# Altium PCB Copy of PCB.PcbDoc (part 3 of 5)
Units mm, origin at the board's own origin, x right, y up, seen from the top; angles counter-clockwise.
Board outline 130 x 115.04 mm, 6 copper layers (Top Layer, Int1 (GND), Int2, Int3 (PWR), Int4 (GND), Bottom Layer), stack 1.647 mm thick; 306 components, 246 nets, 1107 pads, 360 vias.
Unrouted connection lines stored in the file: 123.
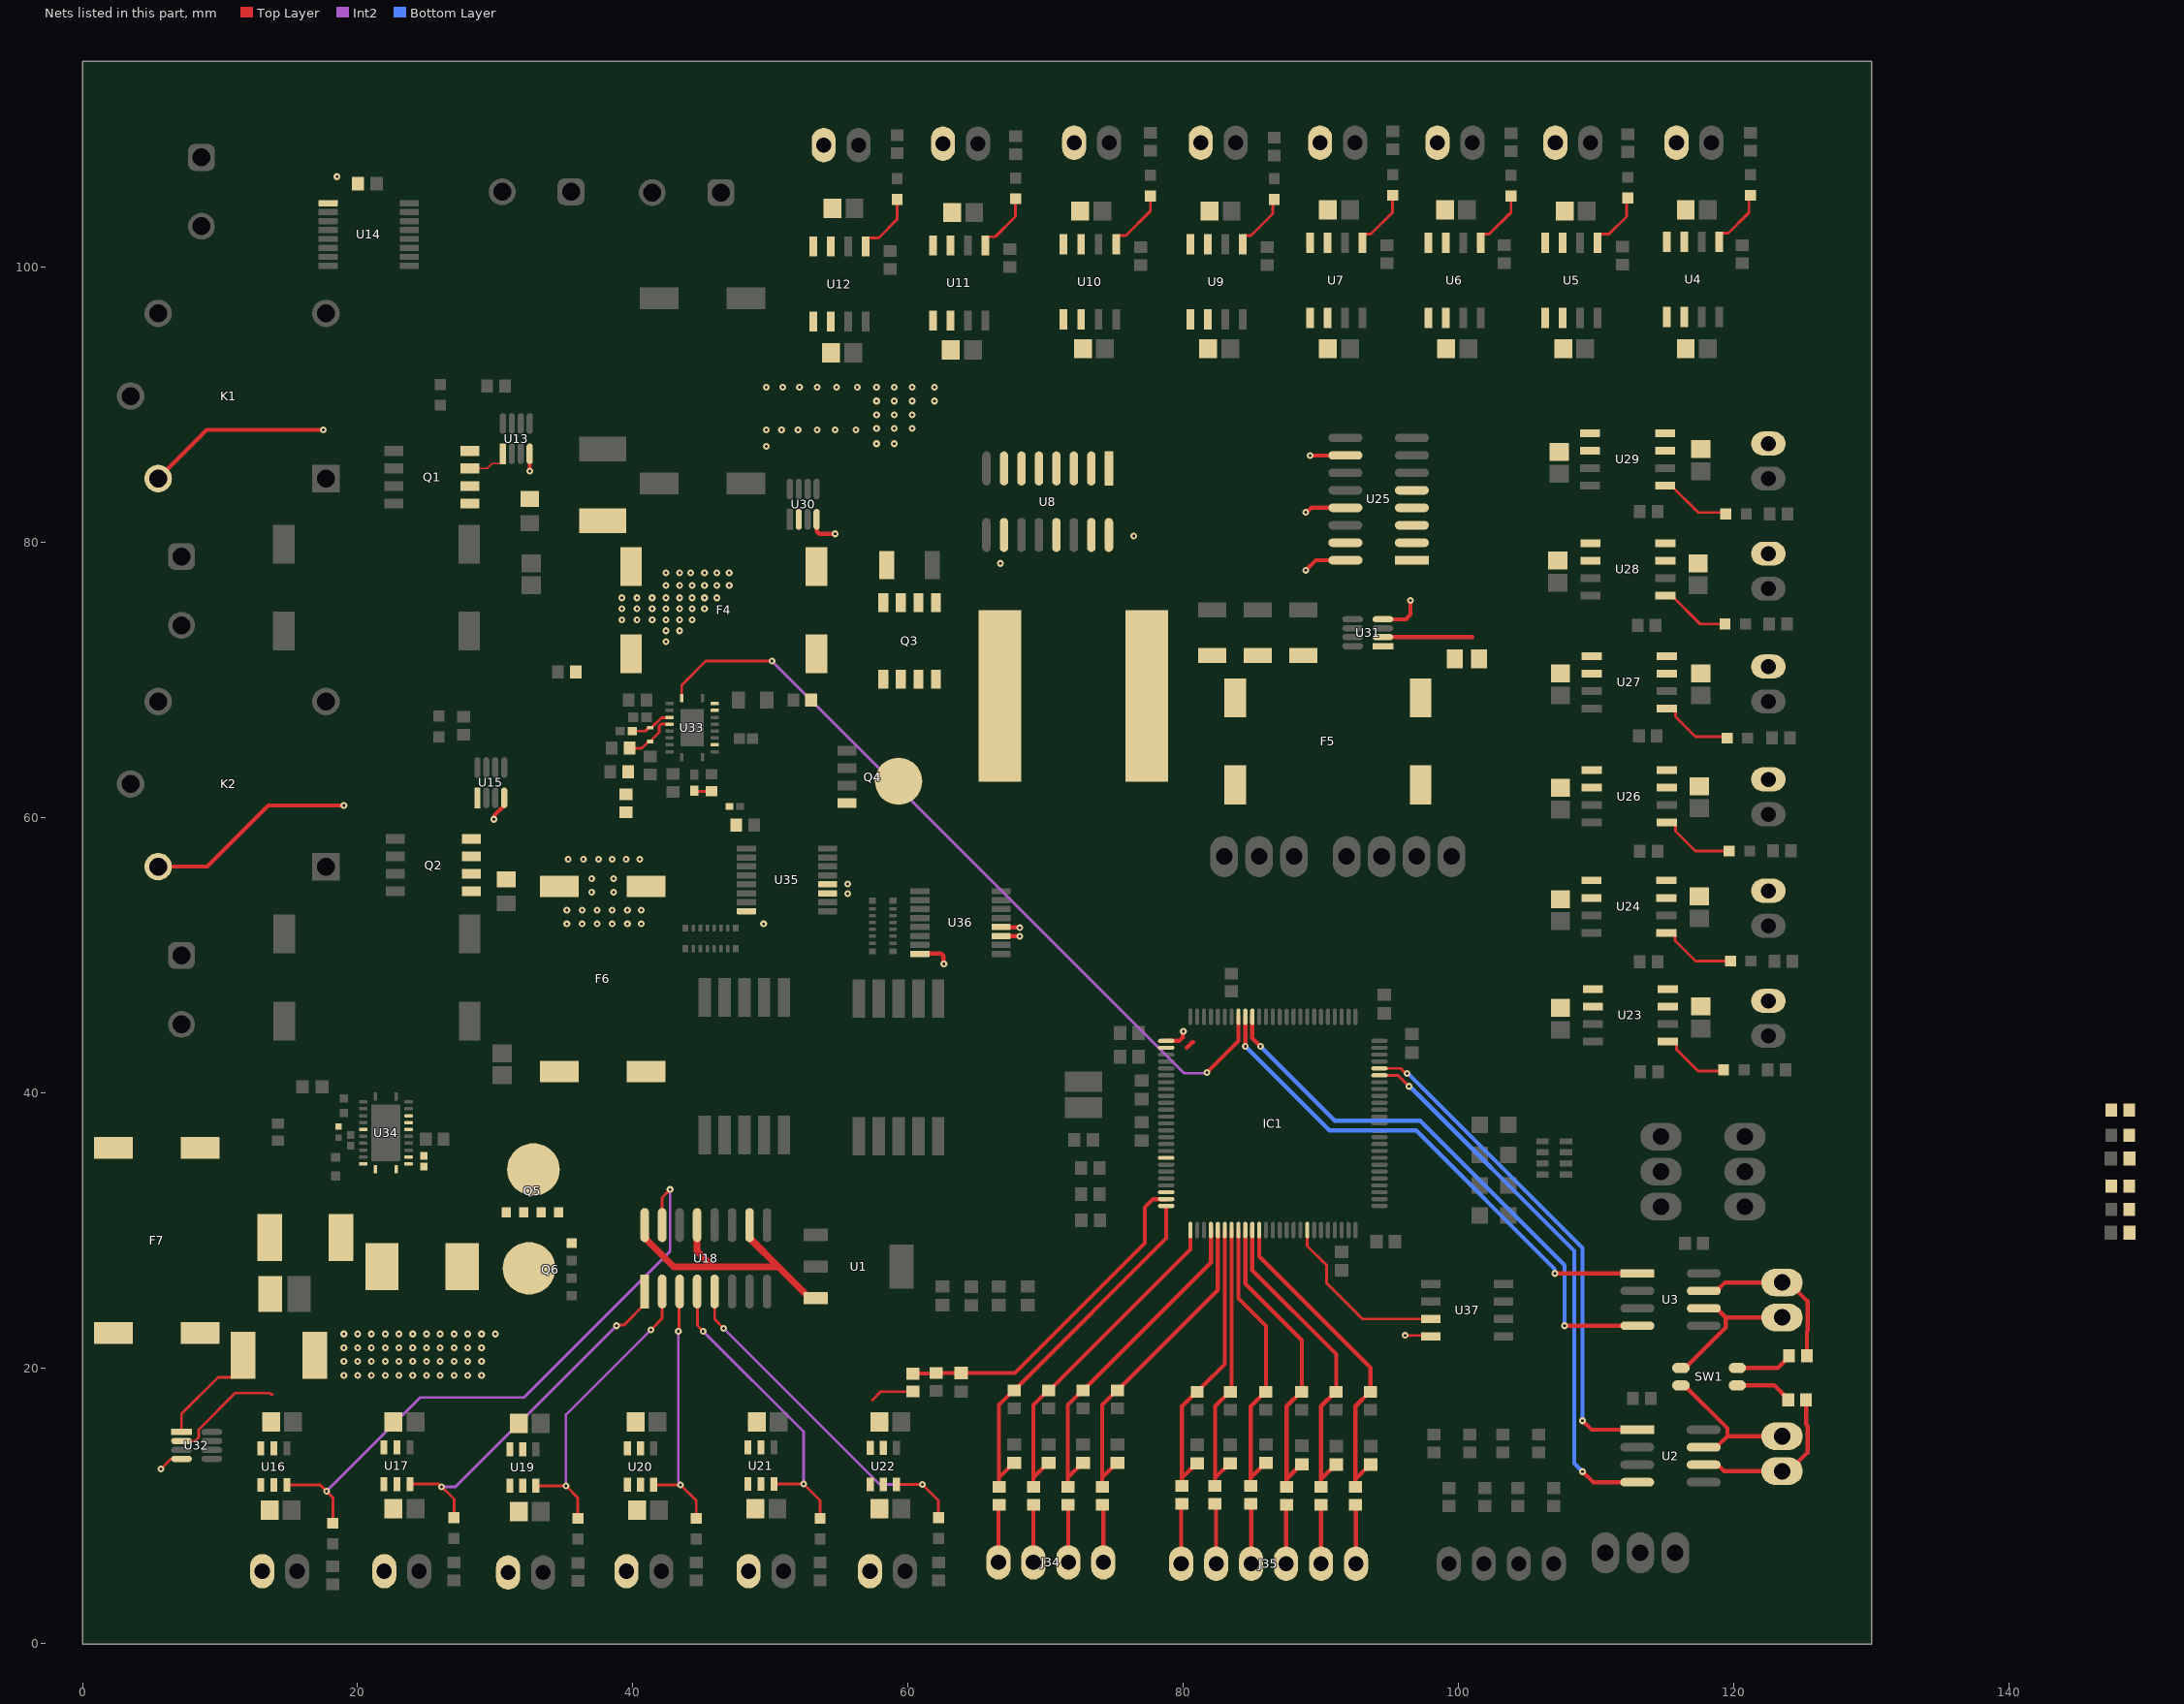
[diagram p6: the nets of this part, all layers, seen from the top]

## Part data (continued)
D2: library part SM0805UYC, "LED YELLOW CLEAR 0805 SMD", Current - Test=20mA, Device Package="0805 (2012 Metric)", Lens Color=Colorless, manufacturer="Bivar Inc.", Millicandela Rating=70mcd, Supplier Device Package=0805, Supplier Part Number 1=492-1328-1-ND, Voltage - Forward (Vf) (Typ)=2.1V, Color=Yellow, componentlink1description=Datasheet, componentlink1url=https://www.bivar.com/Files/Datasheets/SM0805UYC.pdf, componentlink2description="DigiKey Link", componentlink2url=https://www.digikey.com/en/products/detail/bivar-inc/SM0805UYC/2408547, Configuration=Standard, Height (Max)=0.80mm, lastupdated="1/17/2024 9:34:39 PM", Lens Size="1.40mm x 1.20mm", Lens Style="Rectangle with Flat Top", Lens Transparency=Clear, Lifecycle Status=Active, Minimum Order=1, Mounting Type="Surface Mount", Package / Case="0805 (2012 Metric)", packaging=TapeAndReel, Part Number=SM0805UYC, Part Status=Active, partid=64, price=0.17, series=-, Size / Dimension="2.00mm L x 1.20mm W", Supplier 1=DigiKey, Viewing Angle=130°, Wavelength - Dominant=592nm, Wavelength - Peak=593nm
D3: library part SM0805UGC, "LED GREEN CLEAR 0805 SMD", Current - Test=20mA, Device Package="0805 (2012 Metric)", Lens Color=Colorless, manufacturer="Bivar Inc.", Millicandela Rating=10mcd, Supplier Device Package=0805, Supplier Part Number 1=492-1329-1-ND, Voltage - Forward (Vf) (Typ)=2V, Color=Green, componentlink1description=Datasheet, componentlink1url=https://www.bivar.com/Files/Datasheets/SM0805UGC.pdf, componentlink2description="DigiKey Link", componentlink2url=https://www.digikey.com/en/products/detail/bivar-inc/SM0805UGC/2408549, Configuration=Standard, Height (Max)=1.10mm, lastupdated="1/17/2024 9:33:43 PM", Lens Size="1.40mm x 1.20mm", Lens Style="Rectangle with Flat Top", Lens Transparency=Clear, Lifecycle Status=Active, Minimum Order=1, Mounting Type="Surface Mount", Package / Case="0805 (2012 Metric)", packaging=TapeAndReel, Part Number=SM0805UGC, Part Status=Active, partid=247, price=0.19, series=-, Size / Dimension="2.00mm L x 1.20mm W", Supplier 1=DigiKey, Viewing Angle=130°, Wavelength - Dominant=565nm, Wavelength - Peak=563nm
D4: library part SM0805UBWC, "LED BLUE CLEAR 0805 SMD", Current - Test=20mA, Device Package="0805 (2012 Metric)", Lens Color=Colorless, manufacturer="Bivar Inc.", Millicandela Rating=115mcd, Supplier Device Package=0805, Supplier Part Number 1=492-1330-1-ND, Voltage - Forward (Vf) (Typ)=3.3V, Color=Blue, componentlink1description=Datasheet, componentlink1url=https://www.bivar.com/Files/Datasheets/SM0805UBWC.pdf, componentlink2description="DigiKey Link", componentlink2url=https://www.digikey.com/en/products/detail/bivar-inc/SM0805UBWC/2408548, Configuration=Standard, Height (Max)=1.10mm, lastupdated="1/17/2024 9:31:18 PM", Lens Size="1.40mm x 1.20mm", Lens Style="Rectangle with Flat Top", Lens Transparency=Clear, Lifecycle Status=Active, Minimum Order=1, Mounting Type="Surface Mount", Package / Case="0805 (2012 Metric)", packaging=TapeAndReel, Part Number=SM0805UBWC, Part Status=Active, partid=763, price=0.46, series=-, Size / Dimension="2.00mm L x 1.20mm W", Supplier 1=DigiKey, Viewing Angle=130°, Wavelength - Dominant=470nm, Wavelength - Peak=468nm
D5 D6 D7 D8 D9 D10 D11 D12 D13 D14 D15 D16 D17 D18 D19 D20 D21 D22 D23 D24 D25 D26: library part 19-213SDRC/S259/TR8, "LED RED CLEAR 2SMD", Current - Test=10mA, Device Package="0603 (1608 Metric)", Lens Color=Colorless, manufacturer="Everlight Electronics Co Ltd", Supplier Device Package=2-SMD, Supplier Part Number 1=1080-1580-1-ND, Voltage - Forward (Vf) (Typ)=2V, Color=Red, componentlink1description=Datasheet, componentlink1url=//media.digikey.com/pdf/Data%20Sheets/Everlight%20PDFs/19-213SDRC-S259-TR8.pdf, componentlink2description="DigiKey Link", componentlink2url=http://digikey.com/product-detail/en/everlight-electronics-co-ltd/19-213SDRC-S259-TR8/1080-1580-1-ND/8535303, Configuration=Standard, Height (Max)=0.70mm, lastupdated="2/2/2024 9:29:56 PM", Lens Size="1.20mm x 0.80mm", Lens Style="Rectangle with Flat Top", Lens Transparency=Clear, Lifecycle Status=Active, Minimum Order=1, Mounting Type="Surface Mount", Package / Case="0603 (1608 Metric)", packaging=TapeAndReel, Part Number=19-213SDRC/S259/TR8, Part Status=Active, partid=372, price=0.06, series=-, Size / Dimension="1.60mm L x 0.80mm W", Supplier 1=DigiKey, Viewing Angle=120°, Wavelength - Peak=650nm
DS1 DS2: library part CMP-44525-000002-1, "DISPLAY 7-SEG 0.2\" SGL RED 10SMD", Case/Package=SMD/SMT, Color=Red, Forward Current=30mA, Forward Voltage=1.95V, Max Operating Temperature=85°C, Max Power Dissipation=75mW, Min Operating Temperature=-40°C, Package Quantity=650, Test Current=20mA, Element Configuration="Common Cathode", Height=0.315inch, Illumination Color=Red, Lead Free="Lead Free", Luminous Intensity=30mcd, Number of Characters=1, Operating Supply Voltage=1.95V, packaging="Tape and Reel", Power Consumption=75mW, Wavelength=630nm, Width=0.272inch
F1 F2 F3 F4 F5 F6 F7: library part 3587-10TR, Package=None, Availability=Unavailable, MP=3587-10TR, price=None
IC1: "IC MCU 32BIT 512KB FLASH 100LQFP", Device Package=100-LQFP, manufacturer=STMicroelectronics, Operating Temperature="-40°C ~ 85°C (TA)", Supplier Device Package="100-LQFP (14x14)", Supplier Part Number 1=497-15375-ND, Voltage - Supply (Vcc/Vdd)="1.7V ~ 3.6V", componentlink1description=Datasheet, componentlink1url=http://www.st.com/content/ccc/resource/technical/document/datasheet/65/cb/75/50/53/d6/48/24/DM00141306.pdf/files/DM00141306.pdf/jcr:content/translations/en.DM00141306.pdf, componentlink2description="DigiKey Link", componentlink2url=//digikey.com/product-detail/en/stmicroelectronics/STM32F446VET6/497-15375-ND/5175961, Connectivity="CANbus, EBI/EMI, I²C, IrDA, LINbus, SAI, SD, SPDIF-Rx, SPI, UART/USART, USB, USB OTG", Core Processor="ARM® Cortex®-M4", Core Size=32-Bit, Data Converters="A/D 16x12b; D/A 2x12b", lastupdated="12/6/2019 1:21:46 AM", Lifecycle Status=0, Minimum Order=1, Mounting Type="Surface Mount", Number of I/O=81, Oscillator Type=Internal, Package / Case=100-LQFP, packaging=Tray, Part Number=STM32F446VET6, Part Status=Active, partid=128, Peripherals="Brown-out Detect/Reset, DMA, I²S, LVD, POR, PWM, WDT", price=8.21, Program Memory Size="512KB (512K x 8)", Program Memory Type=FLASH, RAM Size="128K x 8", series=STM32F4, Speed=180MHz, Supplier 1=DigiKey
J1: "CONN HEADER VERT 4POS 2.54MM", Insulation Color=Natural, manufacturer=Molex, Material Flammability Rating="UL94 V-0", Supplier Part Number 1=WM4113-ND, componentlink1description=Datasheet, componentlink1url=https://www.molex.com/pdm_docs/sd/022272041_sd.pdf, componentlink2description="DigiKey Link", componentlink2url=http://digikey.com/product-detail/en/molex/0022272041/WM4113-ND/1130579, Connector Type=Header, Contact Finish - Mating=Tin, Contact Finish - Post=Tin, Contact Finish Thickness - Mating="100.0µin (2.54µm)", Contact Length - Mating="0.295\" (7.49mm)", Contact Length - Post="0.140\" (3.56mm)", Contact Material=Brass, Contact Shape=Square, Contact Type="Male Pin", Fastening Type="Friction Lock", Insulation Height="0.461\" (11.70mm)", Insulation Material="Polyamide (PA), Nylon", lastupdated="1/12/2020 11:52:05 PM", Lifecycle Status=Active, Minimum Order=1, Mounting Type="Through Hole", Number of Positions=4, Number of Positions Loaded=All, Number of Rows=1, Overall Contact Length="0.560\" (14.22mm)", packaging=Bulk, Part Number=0022272041, Part Status=Active, partid=78, Pitch - Mating="0.100\" (2.54mm)", price=0.40, series="KK 6410", Shrouding="Shrouded - 1 Wall", Style="Board to Cable/Wire", Supplier 1=DigiKey, Termination=Solder
J2 J3 J4 J5: "CONN HEADER VERT 3POS 2.54MM", Part Number=0022272031
J6 J7: "CONN HEADER VERT 2POS 2.54MM", Part Number=0022272021
J8 J9 J10 J11 J12 J13 J14 J15 J19 J20 J21 J22 J23 J24 J25 J26 J27 J28 J29 J30: "TERM BLK 2P SIDE ENT 2.54MM PCB", Color=Green, Current=10A, manufacturer="TE Connectivity AMP Connectors", Supplier Part Number 1=A98333-ND, Voltage=150V, componentlink1description=Datasheet, componentlink1url=https://www.te.com/commerce/DocumentDelivery/DDEController?Action=srchrtrv&DocNm=282834&DocType=Customer+Drawing&DocLang=English, componentlink2description="DigiKey Link", componentlink2url=http://digikey.com/product-detail/en/te-connectivity-amp-connectors/282834-2/A98333-ND/1150135, lastupdated="1/15/2020 4:15:38 AM", Lifecycle Status=Active, Mating Orientation="Horizontal with Board", Minimum Order=1, Mounting Type="Through Hole", Number of Levels=1, packaging=Bulk, Part Number=282834-2, Part Status=Active, Pitch="0.100\" (2.54mm)", Positions Per Level=2, price=0.88, series=Buchanan, Supplier 1=DigiKey, Wire Gauge="16-30 AWG", Wire Termination="Screw - Rising Cage Clamp"
J16 J17 J18 J31 J32: library part CMP-1502-03324-2, Current Rating=16A, Max Operating Temperature=120°C, Min Operating Temperature=-30°C, Voltage Rating=300V, Contact Material="Nickel, Tin", Height=11.6mm, Lead Pitch=5mm, NexarPartId=78871135, Number of Contacts=2, Number of Pins=2, Number of Rows=1, packaging=Box, RoHS=Non-Compliant
J33 J34: "TERM BLK 4P SIDE ENT 2.54MM PCB", Color=Green, Current=10A, manufacturer="TE Connectivity AMP Connectors", Supplier Part Number 1=A98335-ND, Voltage=150V, componentlink1description=Datasheet, componentlink1url=https://www.te.com/commerce/DocumentDelivery/DDEController?Action=srchrtrv&DocNm=282834&DocType=Customer+Drawing&DocLang=English, componentlink2description="DigiKey Link", componentlink2url=http://digikey.com/product-detail/en/te-connectivity-amp-connectors/282834-4/A98335-ND/1153265, lastupdated="1/15/2020 4:16:05 AM", Lifecycle Status=Active, Mating Orientation="Horizontal with Board", Minimum Order=1, Mounting Type="Through Hole", Number of Levels=1, packaging=Bulk, Part Number=282834-4, Part Status=Active, Pitch="0.100\" (2.54mm)", Positions Per Level=4, price=2.68, series=Buchanan, Supplier 1=DigiKey, Wire Gauge="16-30 AWG", Wire Termination="Screw - Rising Cage Clamp"
J35: "TERM BLK 6P SIDE ENT 2.54MM PCB", Color=Green, Current=10A, manufacturer="TE Connectivity AMP Connectors", Supplier Part Number 1=A98337-ND, Voltage=150V, componentlink1description=Datasheet, componentlink1url=https://www.te.com/commerce/DocumentDelivery/DDEController?Action=srchrtrv&DocNm=282834&DocType=Customer+Drawing&DocLang=English, componentlink2description="DigiKey Link", componentlink2url=http://digikey.com/product-detail/en/te-connectivity-amp-connectors/282834-6/A98337-ND/1153267, lastupdated="1/15/2020 4:16:31 AM", Lifecycle Status=Active, Mating Orientation="Horizontal with Board", Minimum Order=1, Mounting Type="Through Hole", Number of Levels=1, packaging=Bulk, Part Number=282834-6, Part Status=Active, Pitch="0.100\" (2.54mm)", Positions Per Level=6, price=4.72, series=Buchanan, Supplier 1=DigiKey, Wire Gauge="16-30 AWG", Wire Termination="Screw - Rising Cage Clamp"
K1 K2: library part CMP-03395-000112-1, "RELAY GEN PURPOSE SPDT 10A 5V", Ambient Temperature Range High=+70°C, Ambient Temperature Range Low=-30°C, Coil Power=360mW, Coil Resistance=70Ω, Coil Voltage=5V, Current Rating=10A, manufacturer=TE, Automotive=No, Category=Relay, Coil Type=Non-Latching, componentlink2description=Datasheet, componentlink2url=https://www.te.com/usa-en/product-1-1721150-0.html?te_bu=Cor&te_type=other&te_campaign=oct_glo_cor-oct-global-oth-prtnr-fy19-oct-octo-buy-bom_sma-298_2&elqCampaignId=35216, Device Class L1=Electromechanical, Device Class L2=Relays, Device Class L3="Power Relays", Digikey Description="RELAY GEN PURPOSE SPDT 10A 5V", Height=16.3mm, Lead Free=Yes, Manufacturer Part Number=1-1721150-0, Number of Contacts=1, Octopart=https://octopart.com/1-1721150-0-te+connectivity-41294869, Package=1-1721150-0, RoHS=TRUE, Standoff Height=0.2mm, Switching Current=10A, Throw Configuration=SPDT
L1: "No Description Available", Mfr_Name=Coilcraft, Copyright="Copyright (C) 2024 Ultra Librarian. All rights reserved.", Manufacturer_Part_Number=XAL1580-302MED, RefDes=RefDes, Type=DEV
L2: library part CMP-2000-06445-2, "Commercial Inductors, High Saturation Series 0.47uH 17.5A 4.2mΩ 20%", Case Code (Imperial)=2525, Current Rating=17.5A, DC Resistance (DCR)=4.2mR, Inductance=470nH, Inductance Tolerance=20%, Max DC Current=26A, Max Operating Temperature=125°C, Min Operating Temperature=-55°C, Package Quantity=2000, Self Resonant Frequency=5MHz, Test Frequency=100kHz, Case/Package=2525, Contact Plating=Tin, Core Material=Metal, Depth=6.72mm, Height=3mm, Height - Seated (Max)=0.118inch, Lead Free="Lead Free", Length=7.24mm, Military Standard=Not, Mount="Surface Mount", Number of Pins=2, packaging="Tape and Reel", Radiation Hardening=No, RMS Current (Irms)=17.5A, Saturation Current=26A, Shielding=Shielded, Termination=SMD/SMT, Tolerance=20%, Width=6.47mm
Q1 Q2 Q3: "60-V, N channel NexFETâ„¢ power MOSFET, single SON 5 mm x 6 mm, 2.2 mOhm", Package="VSON-CLIP-8 Texas Instruments", Availability="In Stock", Check_prices=https://www.snapeda.com/parts/CSD18540Q5B/Texas+Instruments/view-part/?ref=eda, MF="Texas Instruments", MP=CSD18540Q5B, price=None, Purchase-URL=https://pricing.snapeda.com/search/part/CSD18540Q5B/?ref=eda, SnapEDA_Link=https://www.snapeda.com/parts/CSD18540Q5B/Texas+Instruments/view-part/?ref=snap
Q4: library part CMP-04962-000031-1, "MOSFET N-CH 40V 100A 8VSON", Continuous Drain Current (ID)=100A, Drain To Source Breakdown Voltage=40V, Drain To Source Resistance=1.3mR, Gate to Source Voltage (Vgs)=20V, Input Capacitance=13.9nF, Max Operating Temperature=150°C, Max Power Dissipation=195W, Min Operating Temperature=-55°C, Package Quantity=250, Power Dissipation=3.1W, Threshold Voltage=1.8V, Contact Plating=Gold, Drain to Source Voltage (Vdss)=40V, Element Configuration=Single, Fall Time=11ns, Lead Free="Contains Lead", Mount="Surface Mount", Number Of Channels=1, Number of Elements=1, Number of Pins=8, packaging="Tape and Reel", Rds On Max=1.2mR, REACH SVHC="No SVHC", Rise Time=19ns, RoHS Compliant=Yes, Turn-Off Delay Time=57ns, Turn-On Delay Time=9ns, Weight=0.000847oz
Q5: library part CMP-04962-000014-1, "MOSFET N-CH 60V 8SON", Continuous Drain Current=13A, Drain To Source Breakdown Voltage=60V, Drain To Source Resistance=7.8mΩ, Gate To Source Voltage=20V, Input Capacitace At Vds="1360pF @ 30V", manufacturer="Texas Instruments", Max Forward Diode Voltage=1V, Max Junction Temp=+150°C, Package=DQJ0008A, Power Dissipation=3.1W, Pulse Drain Current=229A, Temperature="-55°C to +150°C", Temperature Range Low=-55°C, Typ Forward Diode Voltage=0.8V, Automotive=No, Category=Trans, componentlink2description=Datasheet, componentlink2url=http://www.ti.com/lit/ds/symlink/csd18534q5a.pdf, Depletion Mode=False, Device Class L1="Discrete Semiconductors", Device Class L2=Transistors, Device Class L3=MOSFETs, Digikey Description="MOSFET N-CH 60V 8SON", Drain To Source Voltage=60V, Gate Charge At Vgs="17nC @ 10V", Height=1.1mm, Lead Free=Yes, Manufacturer Part Number=CSD18534Q5A, Mouser Description="MOSFET 60V N-Ch NexFET Pwr MOSFET", Number Of Channels=1, Number Of N Channels=1, Octopart=https://octopart.com/csd18534q5a-texas+instruments-22791040, Reverse Recovery Charge=54nC, Reverse Recovery Time=40ns, RoHS=TRUE, Rthja Max=50°C/W, Temperature Range High=+150°C, Threshold Vgs Max=2.3V, Threshold Vgs Min=1.5V, Transconductance=72S, Turn Off Delay Time=15ns, Turn On Delay Time=5.2ns
Q6: library part CMP-04962-000077-1, "MOSFET N-CH 40V 89A 8VSON", Continuous Drain Current (ID)=89A, Drain to Source Voltage (Vdss)=40V, Max Operating Temperature=150°C, Max Power Dissipation=74W, Min Operating Temperature=-55°C, Element Configuration=Single, Mount="Surface Mount", Number of Pins=8, packaging="Cut Tape", Rds On Max=7.9mR, RoHS Compliant=Yes
R1 R31: library part AA0603FR-0710KL, "RES SMD 10K OHM 1% 1/10W 0603", Device Package="0603 (1608 Metric)", manufacturer=Yageo, Operating Temperature="-55°C ~ 155°C", Power (Watts)="0.1W, 1/10W", Ratings=AEC-Q200, Supplier Device Package=0603, Supplier Part Number 1=13-AA0603FR-0710KLCT-ND, Temperature Coefficient=±150ppm/°C, Tolerance=±1%, componentlink1description=Datasheet, componentlink1url=https://www.yageo.com/upload/media/product/productsearch/datasheet/rchip/PYu-AA_51_RoHS_L_3.pdf, componentlink2description="DigiKey Link", componentlink2url=https://www.digikey.com/en/products/detail/yageo/AA0603FR-0710KL/5888698, Composition="Thick Film", Features="Anti-Sulfur, Automotive AEC-Q200, Moisture Resistant", Height - Seated (Max)="0.022\" (0.55mm)", lastupdated="1/24/2024 8:37:51 PM", Lifecycle Status=Active, Minimum Order=1, Number of Terminations=2, Package / Case="0603 (1608 Metric)", packaging=TapeAndReel, Part Number=AA0603FR-0710KL, Part Status=Active, partid=64302, price=0.01, Resistance="10 kOhms", series=AA, Size / Dimension="0.063\" L x 0.031\" W (1.60mm x 0.80mm)", Supplier 1=DigiKey
R2 R3: library part AA0603FR-0710KL, "RES SMD 10K OHM 1% 1/10W 0603", Part Number=AA0603FR-0710KL
R4 R5: library part ERA-3AEB121V, "RES SMD 120 OHM 0.1% 1/10W 0603", Part Number=ERA-3AEB121V
R6 R7 R8 R9 R10 R11 R16 R17 R18 R19: library part 7-2176089-3, "RES SMD 64.9K OHM 0.1% 1/6W 0603", Device Package="0603 (1608 Metric)", manufacturer="TE Connectivity Passive Product", Operating Temperature="-55°C ~ 155°C", Power (Watts)="0.167W, 1/6W", Supplier Device Package=0603, Supplier Part Number 1=A110282CT-ND, Temperature Coefficient=±25ppm/°C, Tolerance=±0.1%, componentlink1description=Datasheet, componentlink1url=https://www.te.com/commerce/DocumentDelivery/DDEController?Action=srchrtrv&DocNm=1773272&DocType=DS&DocLang=English, componentlink2description="DigiKey Link", componentlink2url=https://www.digikey.com/en/products/detail/te-connectivity-passive-product/7-2176089-3/4033750, Composition="Thin Film", Height - Seated (Max)="0.022\" (0.55mm)", lastupdated="12/19/2023 8:39:23 PM", Lifecycle Status=Active, Minimum Order=1, Number of Terminations=2, Package / Case="0603 (1608 Metric)", packaging=TapeAndReel, Part Number=7-2176089-3, Part Status=Active, partid=23912, price=0.14, Resistance="64.9 kOhms", series="RP73P, Holsworthy", Size / Dimension="0.061\" L x 0.031\" W (1.55mm x 0.80mm)", Supplier 1=DigiKey
R12 R13: library part PTN0603E6492BST1, "RES 64.9K OHM 0.1% 0.15W 0603", Device Package="0603 (1608 Metric)", manufacturer="Vishay Thin Film", Operating Temperature="-55°C ~ 155°C", Power (Watts)=0.15W, Supplier Device Package=0603, Supplier Part Number 1=764-1449-1-ND, Temperature Coefficient=±25ppm/°C, Tolerance=±0.1%, componentlink1description=Datasheet, componentlink1url=http://www.vishay.com/docs/60026/ptn.pdf, componentlink2description="DigiKey Link", componentlink2url=http://digikey.com/product-detail/en/vishay-thin-film/PTN0603E6492BST1/764-1449-1-ND/7103233, Composition="Thin Film", Features="Anti-Sulfur, Moisture Resistant, Non-Inductive", Height - Seated (Max)="0.020\" (0.51mm)", lastupdated="2/1/2024 8:39:11 PM", Lifecycle Status=Active, Minimum Order=1, Number of Terminations=2, Package / Case="0603 (1608 Metric)", packaging=TapeAndReel, Part Number=PTN0603E6492BST1, Part Status=Active, partid=22193, price=0.21, Resistance="64.9 kOhms", series=PTN, Size / Dimension="0.064\" L x 0.032\" W (1.63mm x 0.81mm)", Supplier 1=DigiKey
R14 R15: library part TLR2ATTD6L00F, "RES 0.006 OHM 1% 1W 0805", Device Package="0805 (2012 Metric)", manufacturer="KOA Speer Electronics, Inc.", Operating Temperature="-65°C ~ 155°C", Power (Watts)=1W, Ratings=AEC-Q200, Supplier Device Package=0805, Supplier Part Number 1=2019-TLR2ATTD6L00FCT-ND, Temperature Coefficient=±100ppm/°C, Tolerance=±1%, componentlink1description=Datasheet, componentlink1url=http://www.koaspeer.com/catimages/Products/TLR1E-2A/TLR1E-2A.pdf, componentlink2description="DigiKey Link", componentlink2url=https://www.digikey.com/en/products/detail/koa-speer-electronics-inc/TLR2ATTD6L00F/9845498, Composition="Metal Element", Features="Automotive AEC-Q200, Current Sense", Height - Seated (Max)="0.018\" (0.45mm)", lastupdated="1/24/2024 8:59:35 PM", Lifecycle Status=Active, Minimum Order=1, Number of Terminations=2, Package / Case="0805 (2012 Metric)", packaging=TapeAndReel, Part Number=TLR2ATTD6L00F, Part Status=Active, partid=42677, price=0.21, Resistance="6 mOhms", series=TLR, Size / Dimension="0.079\" L x 0.049\" W (2.00mm x 1.25mm)", Supplier 1=DigiKey
R20 R21 R26 R43: library part AA0603FR-07100KL, "RES SMD 100K OHM 1% 1/10W 0603", Device Package="0603 (1608 Metric)", manufacturer=Yageo, Operating Temperature="-55°C ~ 155°C", Power (Watts)="0.1W, 1/10W", Ratings=AEC-Q200, Supplier Device Package=0603, Supplier Part Number 1=13-AA0603FR-07100KLCT-ND, Temperature Coefficient=±150ppm/°C, Tolerance=±1%, componentlink1description=Datasheet, componentlink1url=https://www.yageo.com/upload/media/product/productsearch/datasheet/rchip/PYu-AA_51_RoHS_L_3.pdf, componentlink2description="DigiKey Link", componentlink2url=https://www.digikey.com/en/products/detail/yageo/AA0603FR-07100KL/5888687, Composition="Thick Film", Features="Anti-Sulfur, Automotive AEC-Q200, Moisture Resistant", Height - Seated (Max)="0.022\" (0.55mm)", Lifecycle Status=Active, Minimum Order=1, Number of Terminations=2, Package / Case="0603 (1608 Metric)", packaging=TapeAndReel, Part Number=AA0603FR-07100KL, partid=78895, price=0.01, Resistance="100 kOhms", series=AA, Size / Dimension="0.063\" L x 0.031\" W (1.60mm x 0.80mm)", Supplier 1=DigiKey
  R20 R21 R26: lastupdated="12/20/2023 8:36:28 PM"
  R43: lastupdated="1/24/2024 8:36:54 PM"
R22: library part CMP-07231-007414-1, "RES SMD 500 UOHM 1% 6W 2512", Case Code (Imperial)=2512, Case Code (Metric)=6432, Max Operating Temperature=170°C, Max Power Dissipation=6W, Min Operating Temperature=-55°C, Resistance=0.5mR, Resistance Tolerance=1%, Resistor Type="Metal Strip", Temperature Coefficient=50ppm/°C, Case/Package=2512, Features="Moisture Resistant", Height=0.037inch, Length=0.25inch, Number of Terminations=2, packaging="Cut Tape", Power Rating=6W, REACH SVHC="No SVHC", RoHS Compliant=Yes, series=CSS2H-2512, Tolerance=1%, Width=0.12inch
R23: library part CSSH0805FT2L00, "RES 0.002 OHM 1% 1W 0805", Device Package="0805 (2012 Metric)", manufacturer="Stackpole Electronics Inc", Operating Temperature="-55°C ~ 170°C", Power (Watts)=1W, Ratings=AEC-Q200, Supplier Device Package=0805, Supplier Part Number 1=738-CSSH0805FT2L00CT-ND, Temperature Coefficient=±100ppm/°C, Tolerance=±1%, componentlink2description="DigiKey Link", componentlink2url=https://www.digikey.com/en/products/detail/stackpole-electronics-inc/CSSH0805FT2L00/10719360, Composition="Metal Element", Features="Automotive AEC-Q200, Current Sense", Height - Seated (Max)="0.026\" (0.67mm)", lastupdated="1/24/2024 8:58:53 PM", Lifecycle Status=Active, Minimum Order=1, Number of Terminations=2, Package / Case="0805 (2012 Metric)", packaging=TapeAndReel, Part Number=CSSH0805FT2L00, Part Status=Active, partid=50073, price=0.13, Resistance="2 mOhms", series=CSSH, Size / Dimension="0.083\" L x 0.059\" W (2.10mm x 1.50mm)", Supplier 1=DigiKey
R24: library part AC0603FR-07200KL, "RES SMD 200K OHM 1% 1/10W 0603", Device Package="0603 (1608 Metric)", manufacturer=Yageo, Operating Temperature="-55°C ~ 155°C", Power (Watts)="0.1W, 1/10W", Ratings=AEC-Q200, Supplier Device Package=0603, Supplier Part Number 1=YAG3575CT-ND, Temperature Coefficient=±100ppm/°C, Tolerance=±1%, componentlink1description=Datasheet, componentlink1url=https://www.yageo.com/upload/media/product/productsearch/datasheet/rchip/PYu-AC_51_RoHS_L_7.pdf, componentlink2description="DigiKey Link", componentlink2url=https://www.digikey.com/en/products/detail/yageo/AC0603FR-07200KL/5895902, Composition="Thick Film", Features="Automotive AEC-Q200, Moisture Resistant", Height - Seated (Max)="0.022\" (0.55mm)", lastupdated="12/20/2023 8:38:29 PM", Lifecycle Status=Active, Minimum Order=1, Number of Terminations=2, Package / Case="0603 (1608 Metric)", packaging=CutTape, Part Number=AC0603FR-07200KL, Part Status=Active, partid=15822, price=0.01, Resistance="200 kOhms", series=AC, Size / Dimension="0.063\" L x 0.031\" W (1.60mm x 0.80mm)", Supplier 1=DigiKey
R25: library part CPF0603B25K5E1, "RES SMD 25.5KOHM 0.1% 1/16W 0603", Device Package="0603 (1608 Metric)", manufacturer="TE Connectivity Passive Product", Operating Temperature="-55°C ~ 155°C", Power (Watts)="0.063W, 1/16W", Supplier Device Package=0603, Supplier Part Number 1=1712-CPF0603B25K5E1CT-ND, Temperature Coefficient=±25ppm/°C, Tolerance=±0.1%, componentlink1description=Datasheet, componentlink1url=https://www.te.com/commerce/DocumentDelivery/DDEController?Action=srchrtrv&DocNm=1773200&DocType=DS&DocLang=English, componentlink2description="DigiKey Link", componentlink2url=https://www.digikey.com/en/products/detail/te-connectivity-passive-product/CPF0603B25K5E1/2382925, Composition="Thin Film", Height - Seated (Max)="0.022\" (0.55mm)", lastupdated="12/20/2023 8:36:34 PM", Lifecycle Status=Active, Minimum Order=1, Number of Terminations=2, Package / Case="0603 (1608 Metric)", packaging=TapeAndReel, Part Number=CPF0603B25K5E1, Part Status=Active, partid=75127, price=0.12, Resistance="25.5 kOhms", series="CPF, Neohm", Size / Dimension="0.061\" L x 0.031\" W (1.55mm x 0.80mm)", Supplier 1=DigiKey
R27 R30: library part RT0603BRD0735K7L, "RES SMD 35.7KOHM 0.1% 1/10W 0603", Device Package="0603 (1608 Metric)", manufacturer=Yageo, Operating Temperature="-55°C ~ 155°C", Power (Watts)="0.1W, 1/10W", Supplier Device Package=0603, Supplier Part Number 1=YAG1642CT-ND, Temperature Coefficient=±25ppm/°C, Tolerance=±0.1%, componentlink1description=Datasheet, componentlink1url=https://www.yageo.com/upload/media/product/productsearch/datasheet/rchip/PYu-RT_1-to-0.01_RoHS_L_11.pdf, componentlink2description="DigiKey Link", componentlink2url=https://www.digikey.com/en/products/detail/yageo/RT0603BRD0735K7L/1072480, Composition="Thin Film", Height - Seated (Max)="0.022\" (0.55mm)", lastupdated="12/20/2023 8:38:52 PM", Lifecycle Status=Active, Minimum Order=1, Number of Terminations=2, Package / Case="0603 (1608 Metric)", packaging=TapeAndReel, Part Number=RT0603BRD0735K7L, Part Status=Active, partid=9286, price=0.03, Resistance="35.7 kOhms", series=RT, Size / Dimension="0.063\" L x 0.031\" W (1.60mm x 0.80mm)", Supplier 1=DigiKey
R28 R42: library part CMP-03412-006804-1, "METAL SHUNT RESISTOR 2512 1% 75P", manufacturer=Yageo, Package=PU2512-0R005, Power Rating=4W, Resistance=5mΩ, Temperature="-65°C to +170°C", Temperature Coefficient=75ppm/°C, Temperature Range High=+170°C, Temperature Range Low=-65°C, Tolerance=1%, Automotive=Yes, Automotive Grade="Grade 0", Category=Res, componentlink2description=Datasheet, componentlink2url=http://www.yageo.com/documents/recent/PYu-PU_51_RoHS_L_6.pdf, Composition="Metal Element", Device Class L1="Passive Components", Device Class L2=Resistors, Device Class L3="Chip SMD Resistors", Digikey Description="METAL SHUNT RESISTOR 2512 1% 75P", Height=0.94mm, Ipc Land Pattern Name=RESC635318X66, Lead Free=Yes, Manufacturer Part Number=PU2512FKM130R005L, Octopart=https://octopart.com/pu2512fkm130r005l-yageo-96774569, RoHS=TRUE, series=PU
R29 R33 R36: library part AC0603FR-0720KL, "RES SMD 20K OHM 1% 1/10W 0603", Device Package="0603 (1608 Metric)", manufacturer=Yageo, Operating Temperature="-55°C ~ 155°C", Power (Watts)="0.1W, 1/10W", Ratings=AEC-Q200, Supplier Device Package=0603, Supplier Part Number 1=YAG3577CT-ND, Temperature Coefficient=±100ppm/°C, Tolerance=±1%, componentlink1description=Datasheet, componentlink1url=https://www.yageo.com/upload/media/product/productsearch/datasheet/rchip/PYu-AC_51_RoHS_L_7.pdf, componentlink2description="DigiKey Link", componentlink2url=https://www.digikey.com/en/products/detail/yageo/AC0603FR-0720KL/5895907, Composition="Thick Film", Features="Automotive AEC-Q200, Moisture Resistant", Height - Seated (Max)="0.022\" (0.55mm)", Lifecycle Status=Active, Minimum Order=1, Number of Terminations=2, Package / Case="0603 (1608 Metric)", packaging=CutTape, Part Number=AC0603FR-0720KL, Part Status=Active, partid=17364, price=0.01, Resistance="20 kOhms", series=AC, Size / Dimension="0.063\" L x 0.031\" W (1.60mm x 0.80mm)", Supplier 1=DigiKey
  R29: lastupdated="12/20/2023 8:38:24 PM"
  R33 R36: lastupdated="1/16/2024 8:41:47 PM"
R32: library part CRCW06032R10FKEA, "RES SMD 2.1 OHM 1% 1/10W 0603", Device Package="0603 (1608 Metric)", manufacturer="Vishay Dale", Operating Temperature="-55°C ~ 155°C", Power (Watts)="0.1W, 1/10W", Ratings=AEC-Q200, Supplier Device Package=0603, Supplier Part Number 1=541-2.10HHCT-ND, Temperature Coefficient=±100ppm/°C, Tolerance=±1%, componentlink1description=Datasheet, componentlink1url=http://www.vishay.com/docs/20035/dcrcwe3.pdf, componentlink2description="DigiKey Link", componentlink2url=https://www.digikey.com/en/products/detail/vishay-dale/CRCW06032R10FKEA/1961571, Composition="Thick Film", Features="Automotive AEC-Q200", Height - Seated (Max)="0.020\" (0.50mm)", lastupdated="1/16/2024 8:42:05 PM", Lifecycle Status=Active, Minimum Order=1, Number of Terminations=2, Package / Case="0603 (1608 Metric)", packaging=TapeAndReel, Part Number=CRCW06032R10FKEA, Part Status=Active, partid=12898, price=0.01, Resistance="2.1 Ohms", series=CRCW, Size / Dimension="0.061\" L x 0.033\" W (1.55mm x 0.85mm)", Supplier 1=DigiKey
R34: library part CRCW060336R5FKEA, "RES SMD 36.5 OHM 1% 1/10W 0603", Device Package="0603 (1608 Metric)", manufacturer="Vishay Dale", Operating Temperature="-55°C ~ 155°C", Power (Watts)="0.1W, 1/10W", Ratings=AEC-Q200, Supplier Device Package=0603, Supplier Part Number 1=541-36.5HCT-ND, Temperature Coefficient=±100ppm/°C, Tolerance=±1%, componentlink1description=Datasheet, componentlink1url=http://www.vishay.com/docs/20035/dcrcwe3.pdf, componentlink2description="DigiKey Link", componentlink2url=https://www.digikey.com/en/products/detail/vishay-dale/CRCW060336R5FKEA/1174503, Composition="Thick Film", Features="Automotive AEC-Q200", Height - Seated (Max)="0.020\" (0.50mm)", lastupdated="1/24/2024 8:39:33 PM", Lifecycle Status=Active, Minimum Order=1, Number of Terminations=2, Package / Case="0603 (1608 Metric)", packaging=TapeAndReel, Part Number=CRCW060336R5FKEA, Part Status=Active, partid=7915, price=0.01, Resistance="36.5 Ohms", series=CRCW, Size / Dimension="0.061\" L x 0.033\" W (1.55mm x 0.85mm)", Supplier 1=DigiKey
R35: library part AC0603FR-0718KL, "RES SMD 18K OHM 1% 1/10W 0603", Device Package="0603 (1608 Metric)", manufacturer=Yageo, Operating Temperature="-55°C ~ 155°C", Power (Watts)="0.1W, 1/10W", Ratings=AEC-Q200, Supplier Device Package=0603, Supplier Part Number 1=YAG3570CT-ND, Temperature Coefficient=±100ppm/°C, Tolerance=±1%, componentlink1description=Datasheet, componentlink1url=https://www.yageo.com/upload/media/product/productsearch/datasheet/rchip/PYu-AC_51_RoHS_L_7.pdf, componentlink2description="DigiKey Link", componentlink2url=https://www.digikey.com/en/products/detail/yageo/AC0603FR-0718KL/5895836, Composition="Thick Film", Features="Automotive AEC-Q200, Moisture Resistant", Height - Seated (Max)="0.022\" (0.55mm)", lastupdated="1/24/2024 8:38:56 PM", Lifecycle Status=Active, Minimum Order=1, Number of Terminations=2, Package / Case="0603 (1608 Metric)", packaging=CutTape, Part Number=AC0603FR-0718KL, Part Status=Active, partid=17436, price=0.01, Resistance="18 kOhms", series=AC, Size / Dimension="0.063\" L x 0.031\" W (1.60mm x 0.80mm)", Supplier 1=DigiKey
R37: library part ERJ-2RKF6810X, "RES SMD 681 OHM 1% 1/10W 0402", Device Package="0402 (1005 Metric)", manufacturer="Panasonic Electronic Components", Operating Temperature="-55°C ~ 155°C", Power (Watts)="0.1W, 1/10W", Ratings=AEC-Q200, Supplier Device Package=0402, Supplier Part Number 1=P681LCT-ND, Temperature Coefficient=±100ppm/°C, Tolerance=±1%, componentlink1description=Datasheet, componentlink1url=https://industrial.panasonic.com/cdbs/www-data/pdf/RDA0000/AOA0000C304.pdf, componentlink2description="DigiKey Link", componentlink2url=https://www.digikey.com/en/products/detail/panasonic-electronic-components/ERJ-2RKF6810X/192449, Composition="Thick Film", Features="Automotive AEC-Q200", Height - Seated (Max)="0.016\" (0.40mm)", lastupdated="1/24/2024 8:27:52 PM", Lifecycle Status=Active, Minimum Order=1, Number of Terminations=2, Package / Case="0402 (1005 Metric)", packaging=CutTape, Part Number=ERJ-2RKF6810X, Part Status=Active, partid=3811, price=0.01, Resistance="681 Ohms", series=ERJ-2RK, Size / Dimension="0.039\" L x 0.020\" W (1.00mm x 0.50mm)", Supplier 1=DigiKey
R38: library part 5-2176089-3, "RES SMD 39.2K OHM 0.1% 1/6W 0603", Device Package="0603 (1608 Metric)", manufacturer="TE Connectivity Passive Product", Operating Temperature="-55°C ~ 155°C", Power (Watts)="0.167W, 1/6W", Supplier Device Package=0603, Supplier Part Number 1=A110261CT-ND, Temperature Coefficient=±25ppm/°C, Tolerance=±0.1%, componentlink1description=Datasheet, componentlink1url=https://www.te.com/commerce/DocumentDelivery/DDEController?Action=srchrtrv&DocNm=1773272&DocType=DS&DocLang=English, componentlink2description="DigiKey Link", componentlink2url=https://www.digikey.com/en/products/detail/te-connectivity-passive-product/5-2176089-3/4033729, Composition="Thin Film", Height - Seated (Max)="0.022\" (0.55mm)", lastupdated="1/16/2024 8:41:51 PM", Lifecycle Status=Active, Minimum Order=1, Number of Terminations=2, Package / Case="0603 (1608 Metric)", packaging=TapeAndReel, Part Number=5-2176089-3, Part Status=Active, partid=16250, price=0.14, Resistance="39.2 kOhms", series="RP73P, Holsworthy", Size / Dimension="0.061\" L x 0.031\" W (1.55mm x 0.80mm)", Supplier 1=DigiKey
R39: library part 2-2176088-2, "RES SMD 1.27K OHM 0.1% 1/6W 0603", Device Package="0603 (1608 Metric)", manufacturer="TE Connectivity Passive Product", Operating Temperature="-55°C ~ 155°C", Power (Watts)="0.167W, 1/6W", Supplier Device Package=0603, Supplier Part Number 1=A110118CT-ND, Temperature Coefficient=±25ppm/°C, Tolerance=±0.1%, componentlink1description=Datasheet, componentlink1url=https://www.te.com/commerce/DocumentDelivery/DDEController?Action=srchrtrv&DocNm=1773272&DocType=DS&DocLang=English, componentlink2description="DigiKey Link", componentlink2url=https://www.digikey.com/en/products/detail/te-connectivity-passive-product/2-2176088-2/4033586, Composition="Thin Film", Height - Seated (Max)="0.022\" (0.55mm)", lastupdated="1/24/2024 8:38:18 PM", Lifecycle Status=Active, Minimum Order=1, Number of Terminations=2, Package / Case="0603 (1608 Metric)", packaging=TapeAndReel, Part Number=2-2176088-2, Part Status=Active, partid=24589, price=0.14, Resistance="1.27 kOhms", series="RP73P, Holsworthy", Size / Dimension="0.061\" L x 0.031\" W (1.55mm x 0.80mm)", Supplier 1=DigiKey
R40: library part AC0603FR-071K82L, "RES SMD 1.82K OHM 1% 1/10W 0603", Device Package="0603 (1608 Metric)", manufacturer=Yageo, Operating Temperature="-55°C ~ 155°C", Power (Watts)="0.1W, 1/10W", Ratings=AEC-Q200, Supplier Device Package=0603, Supplier Part Number 1=13-AC0603FR-071K82LCT-ND, Temperature Coefficient=±100ppm/°C, Tolerance=±1%, componentlink1description=Datasheet, componentlink1url=https://www.yageo.com/upload/media/product/productsearch/datasheet/rchip/PYu-AC_51_RoHS_L_9.pdf, componentlink2description="DigiKey Link", componentlink2url=https://www.digikey.com/en/products/detail/yageo/AC0603FR-071K82L/5895873, Composition="Thick Film", Features="Automotive AEC-Q200, Moisture Resistant", Height - Seated (Max)="0.022\" (0.55mm)", lastupdated="1/24/2024 8:37:18 PM", Lifecycle Status=Active, Minimum Order=1, Number of Terminations=2, Package / Case="0603 (1608 Metric)", packaging=CutTape, Part Number=AC0603FR-071K82L, Part Status=Active, partid=72129, price=0.01, Resistance="1.82 kOhms", series=AC, Size / Dimension="0.063\" L x 0.031\" W (1.60mm x 0.80mm)", Supplier 1=DigiKey
R41: library part CMP-2002-08406-1, manufacturer="Vishay Dale", Part Number=CRCW040224K3FKED
R44: library part CMP-2002-00289-2, "RES Thick Film, 9.53kΩ, 1%, 0.063W, 100ppm/°C, 0402", Case Code (Imperial)=0402, Case Code (Metric)=1005, Max Operating Temperature=155°C, Max Power Dissipation=63mW, Min Operating Temperature=-55°C, Package Quantity=10, Resistance=9.53kR, Temperature Coefficient=100ppm/°C, Tolerance=1%, Voltage Rating=50V, Case/Package=0402, Composition="Thick Film", Contact Plating=Tin, Depth=0.5mm, Features="Automotive AEC-Q200", Height=0.35mm, Length=1mm, Military Standard=Not, Mount="Surface Mount", Number of Pins=2, Number of Terminations=2, packaging="Tape and Reel", Power Rating=63mW, Radiation Hardening=No, Termination=SMD/SMT, Weight=2.3E-05oz, Width=0.02inch
R45: library part CMP-2000-03820-2, "RES Thick Film, 100kΩ, 1%, 0.1W, 100ppm/°C, 0603", Case Code (Imperial)=0603, Case Code (Metric)=1608, Max Operating Temperature=155°C, Max Power Dissipation=100mW, Min Operating Temperature=-55°C, Package Quantity=10, Resistance=100kR, Temperature Coefficient=100ppm/°C, Tolerance=1%, Voltage Rating=75V, Case/Package=0603, Composition="Thick Film", Contact Plating=Tin, Depth=0.85mm, Features="Automotive AEC-Q200", Height=0.45mm, Lead Free="Lead Free", Length=1.55mm, Military Standard=Not, Number of Pins=2, Number of Terminations=2, packaging="Tape and Reel", Power Rating=100mW, Radiation Hardening=No, Termination=SMD/SMT, Voltage Rating (DC)=75V, Weight=7.1E-05oz, Width=0.033inch
R46: library part CMP-2000-03336-2, "RES Thick Film, 40.2kΩ, 1%, 0.1W, 100ppm/°C, 0603", Case Code (Imperial)=0603, Case Code (Metric)=1608, Max Operating Temperature=155°C, Min Operating Temperature=-55°C, Package Quantity=5000, Power Rating=100mW, Resistance=40.2kR, Temperature Coefficient=100ppm/°C, Tolerance=1%, Voltage Rating=75V, Case/Package=0603, Composition="Thick Film", Contact Plating=Tin, Depth=0.85mm, Height=0.45mm, Lead Free="Lead Free", Length=1.55mm, Military Standard=Not, packaging="Tape and Reel", Radiation Hardening=No, Termination=SMD/SMT, Voltage Rating (DC)=75V, Weight=7.1E-05oz, Width=0.85mm
R47: "RES ARRAY 4 RES 220 OHM 1206", manufacturer="Stackpole Electronics Inc", Number of Resistors=4, Operating Temperature="-55°C ~ 155°C", Package / Case="1206 (3216 Metric), Convex, Long Side Terminals", Power Per Element=62.5mW, Resistance (Ohms)=220, Supplier Part Number 1=RAVF164DJT220RCT-ND, Temperature Coefficient=±200ppm/°C, Tolerance=±5%, Applications="Automotive AEC-Q200", Circuit Type=Isolated, componentlink1description=Datasheet, componentlink1url=https://www.seielect.com/catalog/sei-ravf.pdf, componentlink2description="DigiKey Link", componentlink2url=http://digikey.com/product-detail/en/stackpole-electronics-inc/RAVF164DJT220R/RAVF164DJT220RCT-ND/2425248, Height - Seated (Max)="0.024\" (0.60mm)", lastupdated="9/2/2020 1:23:25 AM", Lifecycle Status=Active, Minimum Order=1, Mounting Type="Surface Mount", Number of Pins=8, packaging=TapeAndReel, Part Number=RAVF164DJT220R, Part Status=Active, partid=59, price=0.01, series=RAVF, Size / Dimension="0.126\" L x 0.063\" W (3.20mm x 1.60mm)", Supplier 1=DigiKey
R48 R51 R52 R53 R54 R55 R56 R57 R58 R59 R60 R61 R62 R63 R64 R93 R94 R95 R96 R97 R98 R99: library part RS73F1JTTD2000B, "RES 200 OHM 0.1% 1/5W 0603", Device Package="0603 (1608 Metric)", manufacturer="KOA Speer Electronics, Inc.", Operating Temperature="-55°C ~ 155°C", Power (Watts)="0.2W, 1/5W", Ratings=AEC-Q200, Supplier Device Package=0603, Supplier Part Number 1=2019-RS73F1JTTD2000BCT-ND, Temperature Coefficient=±25ppm/°C, Tolerance=±0.1%, componentlink1description=Datasheet, componentlink1url=http://www.koaspeer.com/pdfs/RS73.pdf, componentlink2description="DigiKey Link", componentlink2url=https://www.digikey.com/en/products/detail/koa-speer-electronics-inc/RS73F1JTTD2000B/11594419, Composition="Thick Film", Features="Automotive AEC-Q200, Moisture Resistant", Height - Seated (Max)="0.022\" (0.55mm)", lastupdated="2/2/2024 8:38:37 PM", Lifecycle Status=Active, Minimum Order=1, Number of Terminations=2, Package / Case="0603 (1608 Metric)", packaging=TapeAndReel, Part Number=RS73F1JTTD2000B, Part Status=Active, partid=56369, price=0.07, Resistance="200 Ohms", series=RS73, Size / Dimension="0.063\" L x 0.031\" W (1.60mm x 0.80mm)", Supplier 1=DigiKey
R49 R50: "RES ARRAY 8 RES 220 OHM 1506", manufacturer="Stackpole Electronics Inc", Number of Resistors=8, Operating Temperature="-55°C ~ 155°C", Package / Case="1506, Convex, Long Side Terminals", Power Per Element=62.5mW, Resistance (Ohms)=220, Supplier Part Number 1=738-RAVF168DJT220RCT-ND, Temperature Coefficient=±200ppm/°C, Tolerance=±5%, Circuit Type=Isolated, componentlink1description=Datasheet, componentlink1url=https://www.seielect.com/catalog/sei-ravf.pdf, componentlink2description="DigiKey Link", componentlink2url=https://www.digikey.com/en/products/detail/stackpole-electronics-inc/RAVF168DJT220R/6273027, Height - Seated (Max)="0.020\" (0.50mm)", lastupdated="2/1/2024 9:38:25 PM", Lifecycle Status=Active, Minimum Order=1, Mounting Type="Surface Mount", Number of Pins=16, packaging=TapeAndReel, Part Number=RAVF168DJT220R, Part Status=Active, partid=654, price=0.03, series=RAVF, Size / Dimension="0.157\" L x 0.063\" W (4.00mm x 1.60mm)", Supplier 1=DigiKey
R65 R67 R69 R71 R81 R83 R85 R87 R89 R91: library part AC0603FR-7W22KL, "RES 22K OHM 1% 1/5W 0603", Part Number=AC0603FR-7W22KL
R66 R68 R70 R72 R74 R76 R78 R80 R82 R84 R86 R88 R90 R92: library part AC0603FR-0760K4L, "RES SMD 60.4K OHM 1% 1/10W 0603", Part Number=AC0603FR-0760K4L
R73 R75 R77 R79: library part AA0603FR-07100KL, "RES SMD 100K OHM 1% 1/10W 0603", Part Number=AA0603FR-07100KL
SW1: "SWITCH SLIDE DIP SPST 25MA 24V", Part Number=218-2LPST
U1: library part CMP-0395-00503-2, "Single Output LDO, 1 A, Fixed 3.3 V Output, 2 to 5.5 V Input, 4-pin SOT-223 (DCY), -40 to 125 degC, Green (RoHS & no Sb/Br)", manufacturer="Texas Instruments", Accuracy(%)=2, Code_JEDEC=TO-261, componentlink1description="Manufacturer URL", componentlink1url=http://www.ti.com/, componentlink2description=Datasheet, componentlink2url=http://www.ti.com/general/docs/lit/getliterature.tsp?genericPartNumber=TLV1117LV33&fileType=pdf, ComponentLink3Description="Package Specification", ComponentLink3URL=http://www.ti.com/litv/pdf/mpds094a, DatasheetVersion=SBVS160A, Eco-Plan="Green (RoHS & no Sb/Br)", Fixed Output Options(V)=3.3, Iout(Max)(A)=1, Iq(Typ)(mA)=0.05, Mounting Technology="Surface Mount", PackageDescription="4-Pin Plastic Small Outline, Body 3.5 x 6.5 mm, Pitch 2.3 mm", PackageReference=DCY0004A, PackageVersion=4202506/B, PartNumber=TLV1117LV33DCYR, SubFamily="Single Channel LDO", Vdo(Typ)(mV)=1200, Vin(Max)(V)=5.5, Vin(Min)(V)=2, Vout Adj(Max)(V)=3.3, Vout Adj(Min)(V)=3.3
U2 U3: library part CMP-0315-00015-3, "IC TRANSCEIVER HALF 1/1 8SOIC", Case/Package=D, Max Operating Temperature=85°C, Max Supply Current=17mA, Max Supply Voltage=3.6V, Min Operating Temperature=-40°C, Min Supply Voltage=3V, Operating Supply Voltage=3.3V, Package Quantity=1, Contact Plating=Gold, Data Rate=1Mbps, Lead Free="Lead Free", Nominal Supply Current=17mA, Number of Drivers=1, Number of I/Os=2, Number of Pins=8, Number of Receive Buffers=1, Number of Receivers=1, Number of Transceivers=1, Number of Transmit Buffers=1, packaging="Tape and Reel", Radiation Hardening=No, REACH SVHC="No SVHC", Termination=SMD/SMT, Weight=0.002561oz
U4 U5 U6 U7 U9 U10 U11 U12 U23 U24 U26 U27 U28 U29: "No Description Available", Mfr_Name="Alpha and Omega Semiconductor", Manufacturer_Part_Number=AOZ1360AIL, RefDes=RefDes, Type=DEV
  U4 U5 U6 U7 U9 U10 U23 U24 U26 U27 U28 U29: Copyright="Copyright (C) 2023 Ultra Librarian. All rights reserved."
  U11 U12: Copyright="Copyright (C) 2024 Ultra Librarian. All rights reserved."
U8 U18 U25: library part CMP-0780-00061-4, "IC SHIFT REGISTER 8BIT 16-SOIC", Case/Package=SOIC, Frequency=40MHz, Max Operating Temperature=125°C, Max Supply Voltage=6V, Min Operating Temperature=-40°C, Min Supply Voltage=2V, Operating Supply Voltage=5V, Package Quantity=2500, Direction=Unidirectional, Height=1.58mm, Lead Free="Lead Free", Length=9.9mm, Logic Function="Shift Register", Mount="Surface Mount", Number of Bits=8, Number of Bits per Element=8, Number of Circuits=4, Number of Elements=1, Number of Output Lines=10, Number of Pins=16, packaging="Tape and Reel", Propagation Delay=25ns, Radiation Hardening=No, REACH SVHC="No SVHC", RoHS Compliant=Yes, series=74HC, Technology=CMOS, Turn-On Delay Time=185ns, Weight=0.004998oz, Width=3.91mm
U13 U15 U30 U31 U32: library part CMP-0704-00041-3, "IC CURRENT MONITOR 1% SOT23-8", Case/Package=SOT-23-8, Input Offset Voltage (Vos)=100uV, Max Input Voltage=26V, Max Operating Temperature=125°C, Max Supply Current=5mA, Max Supply Voltage=5.5V, Min Input Voltage=0V, Min Operating Temperature=-40°C, Min Supply Voltage=3V, Nominal Supply Current=700uA, Operating Supply Current=1mA, Output Current=10mA, Package Quantity=3000, Accuracy=1%, Bandwidth=3.4MHz, Common Mode Rejection Ratio=100dB, Contact Plating=Gold, Features=I²C, Height=1.3mm, Lead Free="Lead Free", Length=3mm, Number of Amplifiers=1, Number of Pins=8, Output Current per Channel=10mA, Output Type=Digital, packaging="Tape and Reel", Quiescent Current=700uA, Radiation Hardening=No, REACH SVHC="No SVHC", RoHS Compliant=Yes, series=Zero-Drift, Supply Current=700uA, Weight=0.001411oz, Width=1.75mm
U14: library part CMP-0301-00018-2, "7-Channel Low Side Driver, 0 to 40 V VOUT, -40 to 125 degC, 16-Pin TSSOP (PW), RoHS, Tape and Reel", PartNumber=TPL7407L, Temperature Max="125 degC", Temperature Min="-40 degC", CI="5 pF", Code_JEDEC=MO-153, componentlink1description="Manufacturer URL", componentlink1url=http://www.ti.com/, componentlink2description=Datasheet, componentlink2url=http://www.ti.com/lit/ds/symlink/tpl7407l.pdf, ComponentLink3Description="Package Specification", ComponentLink3URL=http://www.ti.com/lit/ml/mpds361/mpds361.pdf, DatasheetVersion=SLRS066C, Mounting Technology="Surface Mount", PackageDescription="16-Pin Plastic Small Outline, Body 5 x 4.4 mm, Pitch 0.65 mm", PackageReference=PW0016A, PackageVersion="4040064-4/G, 02/2011", Packing=TRUE, RoHS="Tape and Reel", VCOM Max="40 V", VCOM Min="8.5 V", VOUT Max="40 V", VOUT Min="0 V"
U16 U17 U19 U20 U21 U22: library part SIP32510DT-T1-GE3, "No Description Available", Mfr_Name=Vishay, Copyright="Copyright (C) 2023 Ultra Librarian. All rights reserved.", Manufacturer_Part_Number=SIP32510DT-T1-GE3, RefDes=RefDes, Type=DEV
U33: library part CMP-04918-000302-1, "IC REG BUCK ADJ 3.5A 20VQFN", RoHS Compliant=Yes
U34: library part CMP-00370-134678441-1, "LM5148RGYR 3.5-V to 80-V, current mode synchronous buck controller 24-VQFN -40 to 125", Case/Package=VQFN, Manufacturer Lifecycle Status=ACTIVE, Height=1mm, Length=5.5mm, Lifecycle Status=Production, NexarPartId=134678441, Number of Pins=24, Thickness=900µm, Width=3.5mm
U35 U36: library part CMP-0388-00393-2, "CMOS BCD-to-7-Segment LED Latch / Decoder / Driver, 3 to 18 V, -55 to 125 degC, 16-pin SOP (PW16), Green (RoHS & no Sb/Br)", manufacturer="Texas Instruments", Rating=Military, Code_JEDEC=MO-153, componentlink1description="Manufacturer URL", componentlink1url=http://www.ti.com/, componentlink2description=Datasheet, componentlink2url=http://www.ti.com/general/docs/lit/getliterature.tsp?genericPartNumber=CD4511B&fileType=pdf, ComponentLink3Description="Package Specification", ComponentLink3URL=http://www.ti.com/lit/ml/mpds361/mpds361.pdf, DatasheetVersion=SCHS072B, Eco-Plan="Green (RoHS & no Sb/Br)", Mounting Technology="Surface Mount", PackageDescription="16-Pin Plastic Small Outline, Body 4.40 x 5.00 mm, Pitch 0.65 mm", PackageReference=PW0016A, PackageVersion=4040064-4/G, PartNumber=CD4511BPWR, SubFamily="Discrete Segment LED Driver", Vin(Max)(V)=18, Vin(Min)(V)=3
U37: library part CMP-2000-05370-2, "IC EEPROM 2K I2C 400KHZ 8SO", Ambient Temperature Range High=+85°C, Ambient Temperature Range Low=-40°C, Frequency=400kHz, manufacturer=STMicroelectronics, Max Supply Voltage=5.5V, Min Supply Voltage=2.5V, Nominal Supply Current=0.5-1mA, Package=SO8N-SO-A, Temperature="-40°C to +85°C", Access Time=900ns, Automotive=No, Category=IC, componentlink2description=Datasheet, componentlink2url=https://www.st.com/resource/en/datasheet/m24c02-w.pdf, Device Class L1="Integrated Circuits (ICs)", Device Class L2=Memory, Device Class L3=EEPROM, Digikey Description="IC EEPROM 2K I2C 400KHZ 8SO", Height=1.75mm, Interface=I2C, Lead Free=Yes, Manufacturer Part Number=M24C02-WMN6TP, Memory Size=2Kbits, Memory Type=EEPROM, Mouser Description="M24C02 Series 2 Kb (256 x 8) 2.5 V SMT Serial I²C Bus EEPROM - SOIC-8", Octopart=https://octopart.com/m24c02-wmn6tp-stmicroelectronics-55404516, RoHS=TRUE, Standoff Height=0.1mm, Temperature Range High=+85°C, Temperature Range Low=-40°C